# Altium PCB 400921.PcbDoc (part 2 of 3)
Units mm, origin at the board's own origin, x right, y up, seen from the top; angles counter-clockwise.
Board outline 33 x 32.99 mm, 4 copper layers (Top Layer, Mid-Layer 1, Mid-Layer 2, Bottom Layer), stack 0.75 mm thick; 113 components, 68 nets, 329 pads, 369 vias.
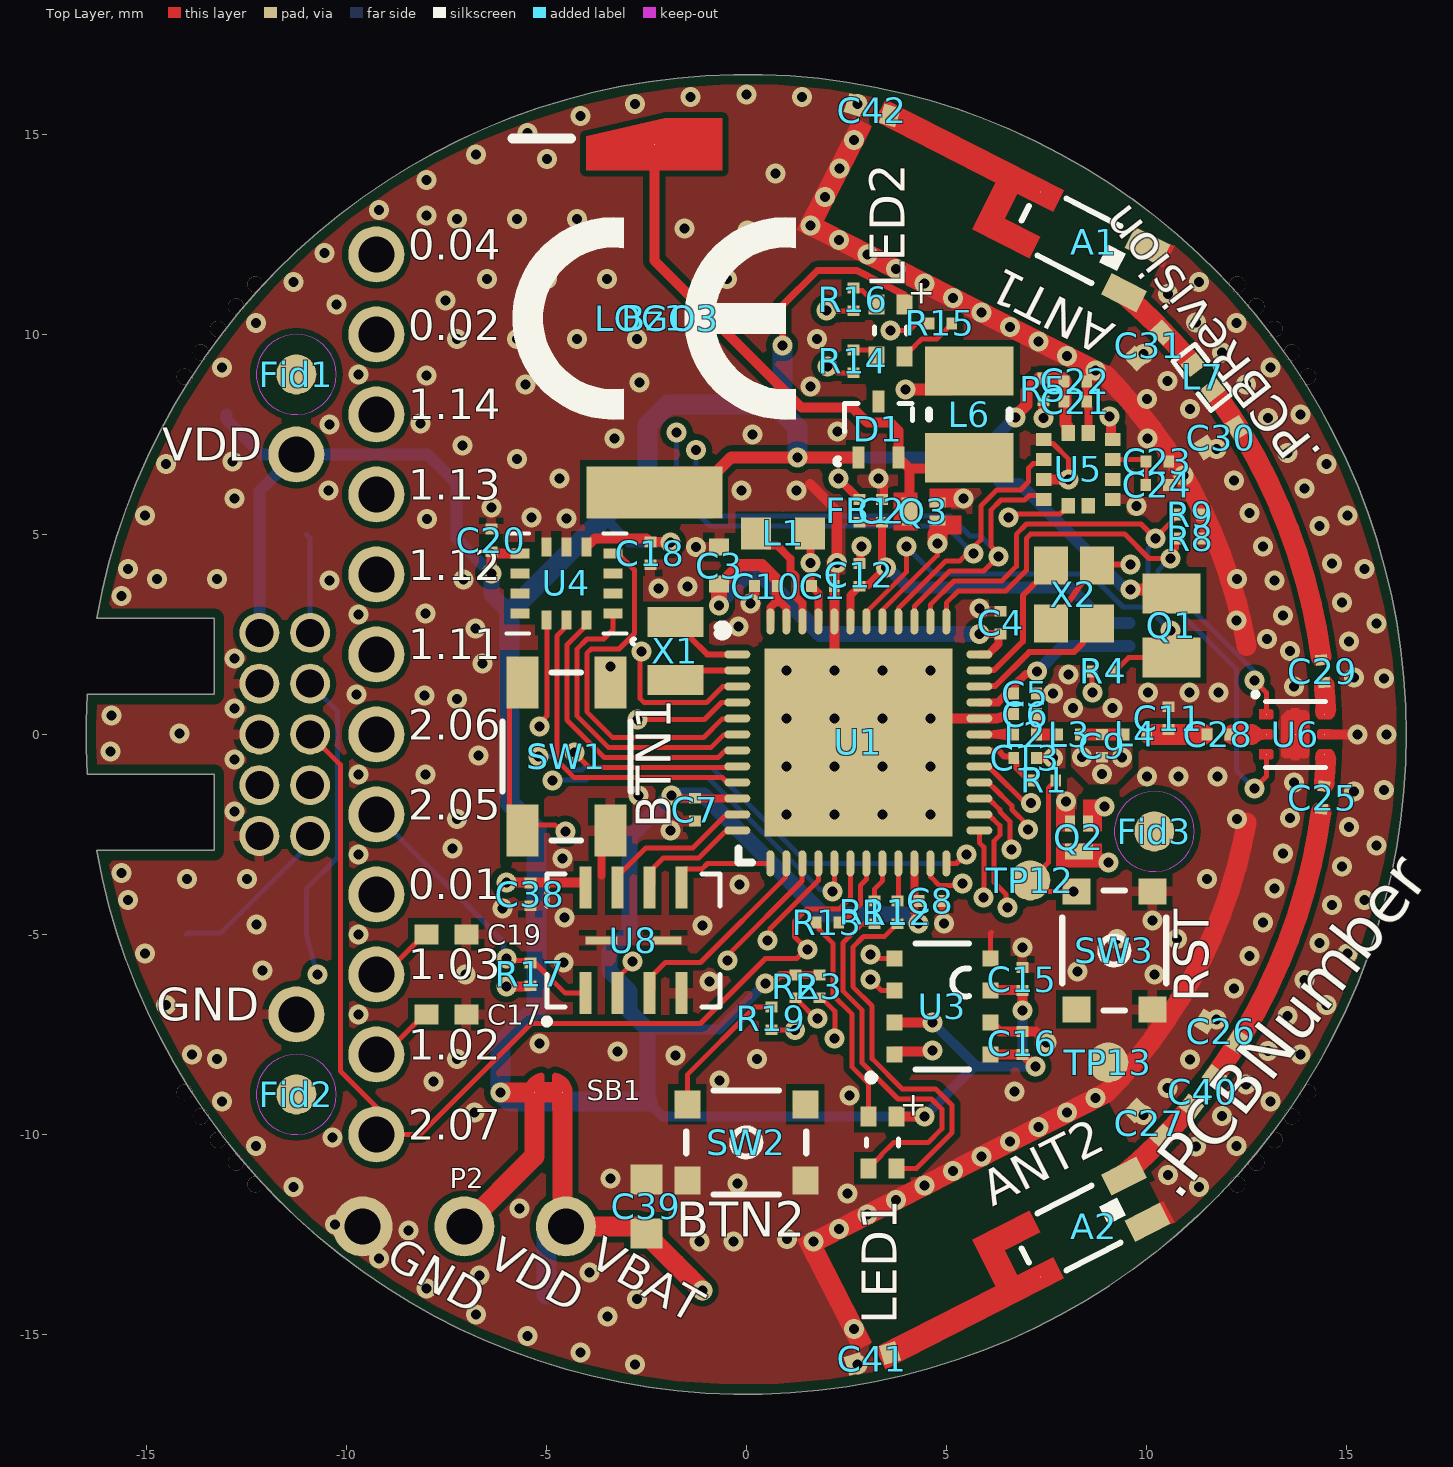
[diagram p0: Top Layer view]

## Part data (continued)
P1: library part "Socket 2x5, 1.27mm, Right Angle, TH", "Socket 2x5, 1.27mm (50mil), Right Angle, TH", Manufacturer=WCON, Manufacturer Part Number=2344-205RS0CUNR3, Part number IPS=N.A., Part number NEMS=100500894, Artikkelnr Noca=N.A., Author=rubr, Component Class=Connectors, Component Status=Active, ComponentLink1Description=Datasheet, ComponentLink1URL=https://www.wcon.com/assets/upload/2023-09-09/C_2344-2XXRXXCUNT1.pdf, ComponentLink2Description="Supplier link", ComponentLink2URL=N.A., Footprint Doc=SOCKET_ANG_2x5_TH-1.27mm, HelpURL=https://www.wcon.com/product/2344-2xxrxxcunx1.html, LatestRevisionDate=2025-01-30, Note="(Replaced 2344-205RS0CUNR1)", Pad Count=10, Part Number="Socket 2x5, 1.27mm, Right Angle, TH", Part number Norautron=N.A., PartId=100500894, Published=2025-01-30, Supplier 1=Milexia, Supplier 2=N.A., Supplier Part Number 1=2344-205RS0CUNR3, Supplier Part Number 2=N.A., System=Connector
P2: library part "Pin List 1x3, N.C.", "Pin List 1x3, 2.54mm (100mil)", Manufacturer=N.A., Part number NEMS=100500305, Artikkelnr Noca=N.A., Assembly="Not mounted", Author=rsk, Component Class=Connectors, Component Status=Active, ComponentLink1Description=Datasheet, ComponentLink1URL=N.A., ComponentLink2Description="Supplier link", ComponentLink2URL=N.A., Footprint Doc=LIST_1x3, HelpURL=N.A., LatestRevisionDate=2017-09-07, Manufacturer Part Number=N.A., Note=N.A., Pad Count=3, Part Number="Pin List 1x3, N.C.", Part number IPS=N.A., Part number Norautron=N.A., PartId=100500305, Published=2017-09-07, Supplier 1=N.A., Supplier 2=N.A., Supplier Part Number 1=N.A., Supplier Part Number 2=N.A., System=Connector
Q1: "Phototransistors 550nm Top View 0805 (2012 Metric)", Manufacturer=Vishay, Part number IPS=N.A., Part number NEMS=101400145, Supplier Part Number 1=751-1056-1-ND, Artikkelnr Noca=N.A., Author=getr, Component Class=Optoelectronics, Component Status=Active, ComponentLink1Description=Datasheet, ComponentLink1URL=https://www.vishay.com/docs/81317/temt6200.pdf, ComponentLink2Description="Supplier link", ComponentLink2URL=https://www.digikey.no/en/products/detail/vishay-semiconductor-opto-division/TEMT6200FX01/1681190?s=N4IgTCBcDaICoFECycBsYAMGBiANDAjAAQgC6AvkA, Footprint Doc=N.A., HelpURL=https://www.vishay.com/en/product/81317/, LatestRevisionDate=2023-11-07, Manufacturer Part Number=TEMT6200FX01, Note=N.A., Pad Count=2, Part Number=TEMT6200FX01, Part number Norautron=N.A., PartId=101400145, Published=2023-11-07, Supplier 1=DigiKey, Supplier 2=N.A., Supplier Part Number 2=N.A.
Q2 Q3: "N-Channel MOSFET, 20V, 1A, 470mOhm, 400mW, -55°C ~ 150°C", Manufacturer="Rohm Semiconductor", Part number IPS=00000009976, Part number NEMS=101300132, Part number Norautron=26320026, Supplier Part Number 1=RV2C010UNT2LCT-ND, Artikkelnr Noca=35010020, Author=rsk, Component Class=Semiconductors, Component Status=Active, ComponentLink1Description=Datasheet, ComponentLink1URL=N.A., ComponentLink2Description="Supplier link", ComponentLink2URL=N.A., Footprint Doc=DFN-3, HelpURL=http://rohmfs.rohm.com/en/products/databook/datasheet/discrete/transistor/mosfet/rv2c010unt2l-e.pdf, LatestRevisionDate=2024-09-18, Manufacturer Part Number=RV2C010UNT2L, Note=N.A., Pad Count=3, Part Number=RV2C010UNT2L, PartId=101300132, Published=2016-08-09, Supplier 1=DigiKey, Supplier 2=Mouser, Supplier Part Number 2=755-RV2C010UNT2L
R1: library part R0201-1k0, "Resistor, ±1%, 0.05W", Manufacturer=N.A., Part number IPS=00000005786, Part number NEMS=100100043, Artikkelnr Noca=N.A., Author=rsk, Component Class=Resistors, Component Status=Active, ComponentLink1Description=Datasheet, ComponentLink1URL=N.A., ComponentLink2Description="Supplier link", ComponentLink2URL=N.A., Footprint Doc=0201, HelpURL=N.A., LatestRevisionDate=2014-11-13, Manufacturer Part Number=N.A., Note="Chip Res 1%", Pad Count=2, Part Number=R0201-1k0, Part number Norautron=N.A., PartId=100100043, Published=2014-11-13, Supplier 1=N.A., Supplier 2=N.A., Supplier Part Number 1=N.A., Supplier Part Number 2=N.A.
R2 R3: library part R0201-10k, "Resistor, ±1%, 0.05W", Manufacturer=N.A., Part number IPS=00000001255, Part number NEMS=100100065, Part number Norautron=26107101, Artikkelnr Noca=N.A., Author=rsk, Component Class=Resistors, Component Status=Active, ComponentLink1Description=Datasheet, ComponentLink1URL=N.A., ComponentLink2Description="Supplier link", ComponentLink2URL=N.A., Footprint Doc=0201, HelpURL=N.A., LatestRevisionDate=2014-11-13, Manufacturer Part Number=N.A., Note="Chip Res 1%", Pad Count=2, Part Number=R0201-10k, PartId=100100065, Published=2014-11-13, Supplier 1=N.A., Supplier 2=N.A., Supplier Part Number 1=N.A., Supplier Part Number 2=N.A.
R4: library part R0201-2k7, "Resistor, ±1%, 0.05W", Manufacturer=N.A., Part number NEMS=100100054, Part number Norautron=26108481, Artikkelnr Noca=N.A., Author=rsk, Component Class=Resistors, Component Status=Active, ComponentLink1Description=Datasheet, ComponentLink1URL=N.A., ComponentLink2Description="Supplier link", ComponentLink2URL=N.A., Footprint Doc=0201, HelpURL=N.A., LatestRevisionDate=2014-11-13, Manufacturer Part Number=N.A., Note="Chip Res 1%", Pad Count=2, Part Number=R0201-2k7, Part number IPS=N.A., PartId=100100054, Published=2014-11-13, Supplier 1=N.A., Supplier 2=N.A., Supplier Part Number 1=N.A., Supplier Part Number 2=N.A.
R5: library part R0201-10R, "Resistor, ±1%, 0.05W", Manufacturer=N.A., Part number NEMS=100100014, Artikkelnr Noca=N.A., Author=rsk, Component Class=Resistors, Component Status=Active, ComponentLink1Description=Datasheet, ComponentLink1URL=N.A., ComponentLink2Description="Supplier link", ComponentLink2URL=N.A., Footprint Doc=0201, HelpURL=N.A., LatestRevisionDate=2014-11-13, Manufacturer Part Number=N.A., Note="Chip Res 1%", Pad Count=2, Part Number=R0201-10R, Part number IPS=N.A., Part number Norautron=N.A., PartId=100100014, Published=2014-11-13, Supplier 1=N.A., Supplier 2=N.A., Supplier Part Number 1=N.A., Supplier Part Number 2=N.A.
R6: library part R0201-4R7, "Resistor, ±1%, 0.05W", Manufacturer=N.A., Part number IPS=00000002486, Part number NEMS=100100010, Artikkelnr Noca=N.A., Author=rsk, Component Class=Resistors, Component Status=Active, ComponentLink1Description=Datasheet, ComponentLink1URL=N.A., ComponentLink2Description="Supplier link", ComponentLink2URL=N.A., Footprint Doc=0201, HelpURL=N.A., LatestRevisionDate=2014-11-13, Manufacturer Part Number=N.A., Note="Chip Res 1%", Pad Count=2, Part Number=R0201-4R7, Part number Norautron=N.A., PartId=100100010, Published=2014-11-13, Supplier 1=N.A., Supplier 2=N.A., Supplier Part Number 1=N.A., Supplier Part Number 2=N.A.
R8 R9: library part R0201-1M0, "Resistor, ±1%, 0.05W", Manufacturer=N.A., Part number IPS=00000001418, Part number NEMS=100100093, Part number Norautron=26107108, Artikkelnr Noca=N.A., Author=rsk, Component Class=Resistors, Component Status=Active, ComponentLink1Description=Datasheet, ComponentLink1URL=N.A., ComponentLink2Description="Supplier link", ComponentLink2URL=N.A., Footprint Doc=0201, HelpURL=N.A., LatestRevisionDate=2014-11-13, Manufacturer Part Number=N.A., Note="Chip Res 1%", Pad Count=2, Part Number=R0201-1M0, PartId=100100093, Published=2014-11-13, Supplier 1=N.A., Supplier 2=N.A., Supplier Part Number 1=N.A., Supplier Part Number 2=N.A.
R11 R14: library part R0201-390, "Resistor, ±1%, 0.05W", Manufacturer=N.A., Part number IPS=00000001258, Part number NEMS=100100035, Part number Norautron=26470031, Artikkelnr Noca=N.A., Author=rsk, Component Class=Resistors, Component Status=Active, ComponentLink1Description=Datasheet, ComponentLink1URL=N.A., ComponentLink2Description="Supplier link", ComponentLink2URL=N.A., Footprint Doc=0201, HelpURL=N.A., LatestRevisionDate=2014-11-13, Manufacturer Part Number=N.A., Note="Chip Res 1%", Pad Count=2, Part Number=R0201-390, PartId=100100035, Published=2014-11-13, Supplier 1=N.A., Supplier 2=N.A., Supplier Part Number 1=N.A., Supplier Part Number 2=N.A.
R12 R15: library part R0201-2k2, "Resistor, ±1%, 0.05W", Manufacturer=N.A., Part number IPS=00000001257, Part number NEMS=100100052, Part number Norautron=26470030, Artikkelnr Noca=N.A., Author=rsk, Component Class=Resistors, Component Status=Active, ComponentLink1Description=Datasheet, ComponentLink1URL=N.A., ComponentLink2Description="Supplier link", ComponentLink2URL=N.A., Footprint Doc=0201, HelpURL=N.A., LatestRevisionDate=2014-11-13, Manufacturer Part Number=N.A., Note="Chip Res 1%", Pad Count=2, Part Number=R0201-2k2, PartId=100100052, Published=2014-11-13, Supplier 1=N.A., Supplier 2=N.A., Supplier Part Number 1=N.A., Supplier Part Number 2=N.A.
R13 R16: library part R0201-1k2, "Resistor, ±1%, 0.05W", Manufacturer=N.A., Part number IPS=00000001256, Part number NEMS=100100045, Part number Norautron=26107084, Artikkelnr Noca=N.A., Author=rsk, Component Class=Resistors, Component Status=Active, ComponentLink1Description=Datasheet, ComponentLink1URL=N.A., ComponentLink2Description="Supplier link", ComponentLink2URL=N.A., Footprint Doc=0201, HelpURL=N.A., LatestRevisionDate=2014-11-13, Manufacturer Part Number=N.A., Note="Chip Res 1%", Pad Count=2, Part Number=R0201-1k2, PartId=100100045, Published=2014-11-13, Supplier 1=N.A., Supplier 2=N.A., Supplier Part Number 1=N.A., Supplier Part Number 2=N.A.
R17: library part R0201-100k, "Resistor, ±1%, 0.05W", Manufacturer=N.A., Part number IPS=00000001419, Part number NEMS=100100080, Part number Norautron=26108487, Artikkelnr Noca=N.A., Author=rsk, Component Class=Resistors, Component Status=Active, ComponentLink1Description=Datasheet, ComponentLink1URL=N.A., ComponentLink2Description="Supplier link", ComponentLink2URL=N.A., Footprint Doc=0201, HelpURL=N.A., LatestRevisionDate=2014-11-13, Manufacturer Part Number=N.A., Note="Chip Res 1%", Pad Count=2, Part Number=R0201-100k, PartId=100100080, Published=2014-11-13, Supplier 1=N.A., Supplier 2=N.A., Supplier Part Number 1=N.A., Supplier Part Number 2=N.A.
R19: library part R0201-0R, "Resistor, ±5%, 0.05W", Manufacturer=N.A., Part number IPS=00000003245, Part number NEMS=100100001, Artikkelnr Noca=N.A., Author=rsk, Component Class=Resistors, Component Status=Active, ComponentLink1Description=Datasheet, ComponentLink1URL=N.A., ComponentLink2Description="Supplier link", ComponentLink2URL=N.A., Footprint Doc=0201, HelpURL=N.A., LatestRevisionDate=2017-11-09, Manufacturer Part Number=N.A., Note="Chip Res 5%", Pad Count=2, Part Number=R0201-0R, Part number Norautron=N.A., PartId=100100001, Published=2014-11-13, Supplier 1=N.A., Supplier 2=N.A., Supplier Part Number 1=N.A., Supplier Part Number 2=N.A.
SB1: library part "Solderbridge Shorted Power", "Shorted Solderbridge Power", Manufacturer=N.A., Part number NEMS=100500460, Artikkelnr Noca=N.A., Author=rsk, Component Class=Connectors, Component Status=Active, ComponentLink1Description=Datasheet, ComponentLink1URL=N.A., ComponentLink2Description="Supplier link", ComponentLink2URL=N.A., Footprint Doc=Solderbridge_Shorted_Power, HelpURL=N.A., LatestRevisionDate=2012-08-07, Manufacturer Part Number=N.A., Note=N.A., Pad Count=2, Part Number="Solderbridge Shorted Power", Part number IPS=N.A., Part number Norautron=N.A., PartId=100500460, Published=2012-08-07, Supplier 1=N.A., Supplier 2=N.A., Supplier Part Number 1=N.A., Supplier Part Number 2=N.A., System=Connector
SW1: library part L-KLS7-TS3402-2.5-250-B-T, "Tactile Switch, SPNO, SMD, 260gf, 4.2x3.3x2.5mm", Manufacturer="KLS Electronic", Part number IPS=N.A., Part number NEMS=101500152, Artikkelnr Noca=N.A., Author=rubr, Component Class=Switches, Component Status=Active, ComponentLink1Description=Datasheet, ComponentLink1URL=https://img.klsele.com/admin/product_upload/20220406093556L-KLS7-TS3402.pdf, ComponentLink2Description="Supplier link", ComponentLink2URL=N.A., Footprint Doc=KLS-TS3402, HelpURL=https://www.klsele.com/products/Switches/Tactile-switches/4201.html, LatestRevisionDate=2026-02-09, Manufacturer Part Number=L-KLS7-TS3402-2.5-250-B-T, Note=N.A., Pad Count=4, Part Number=L-KLS7-TS3402-2.5-250-B-T, Part number Norautron=N.A., PartId=101500152, Published=2025-01-23, Supplier 1=Milexia, Supplier 2=N.A., Supplier Part Number 1=L-KLS7-TS3402-2.5-250-B-T, Supplier Part Number 2=N.A.
SW2 SW3: library part "KMT021 NGJ LHS", "Nano-Miniature Top Actuated Tact Switch with extended life 3.0x2.6mm", Manufacturer=C&K, Part number IPS=00000005416, Part number NEMS=101500039, Part number Norautron=N.A., Supplier Part Number 1=CKN10289CT-ND, Artikkelnr Noca=N.A., Author=rsk, Component Class=Switches, Component Status=Active, ComponentLink1Description=Datasheet, ComponentLink1URL=N.A., ComponentLink2Description="Supplier link", ComponentLink2URL=N.A., Footprint Doc=SW_TACTILE_2.6x3.0MM_4-LEAD, HelpURL=http://media.digikey.com/pdf/Data%20Sheets/C&K/KMT_0xx_NGJ_LHS_Drawing.pdf, LatestRevisionDate=2013-08-12, Manufacturer Part Number="KMT021 NGJ LHS", Note=N.A., Pad Count=4, Part Number="KMT021 NGJ LHS", PartId=101500039, Published=2013-08-12, Supplier 1=DigiKey, Supplier 2=Farnell, Supplier Part Number 2=190-8260
TP1 TP2 TP3 TP4 TP5 TP6 TP7: library part TP_SMD_Ø1.5MM, "1.5mm circular SMD testpad", Manufacturer="Nordic Semiconductor", Manufacturer Part Number=N.A., Part number NEMS=100500477, Artikkelnr Noca=N.A., Author=rsk, Component Class=Connectors, Component Status=Active, ComponentLink1Description=Datasheet, ComponentLink1URL=N.A., ComponentLink2Description="Supplier link", ComponentLink2URL=N.A., Footprint Doc=TP_SMD_Ø1.5mm, HelpURL=N.A., LatestRevisionDate=2021-03-05, Note=N.A., Pad Count=1, Part Number=TP_SMD_Ø1.5MM, Part number IPS=N.A., Part number Norautron=N.A., PartId=100500477, Published=2016-06-02, Supplier 1=N.A., Supplier 2=N.A., Supplier Part Number 1=N.A., Supplier Part Number 2=N.A.
TP12 TP13: library part TP_SMD_Ø1.0MM, "1.0mm circular SMD testpad", Manufacturer="Nordic Semiconductor", Manufacturer Part Number=N.A., Part number NEMS=100500475, Artikkelnr Noca=N.A., Author=rsk, Component Class=Connectors, Component Status=Active, ComponentLink1Description=Datasheet, ComponentLink1URL=N.A., ComponentLink2Description="Supplier link", ComponentLink2URL=N.A., Footprint Doc=TP_SMD_Ø1.0mm, HelpURL=N.A., LatestRevisionDate=2021-03-05, Note=N.A., Pad Count=1, Part Number=TP_SMD_Ø1.0MM, Part number IPS=N.A., Part number Norautron=N.A., PartId=100500475, Published=2013-06-11, Supplier 1=N.A., Supplier 2=N.A., Supplier Part Number 1=N.A., Supplier Part Number 2=N.A.
U1: "Multi-protocol Bluetooth Low Energy, IEEE 802.15.4 and 2.4GHz proprietary Wireless MCU", Manufacturer="Nordic Semiconductor", Part number IPS=N.A., Part number NEMS=102000382, Artikkelnr Noca=N.A., Author=stl1, Component Class=Nordic_Devices, Component Status=Active, ComponentLink1Description=Datasheet, ComponentLink1URL=N.A., ComponentLink2Description="Supplier link", ComponentLink2URL=N.A., Footprint Doc=QFN-48, HelpURL=N.A., LatestRevisionDate=2025-01-30, Manufacturer Part Number=nRF54L15-QFAA-C00, Note=N.A., Pad Count=49, Part Number=nRF54L15-QFAA-C00, Part number Norautron=N.A., PartId=102000382, Published=2025-01-30, Supplier 1="Nordic Semiconductor", Supplier 2=N.A., Supplier Part Number 1=nRF54L15-QFAA-C00, Supplier Part Number 2=N.A.
U3: "Low power gas, pressure, temperature & humidity sensor", Manufacturer=Bosch, Part number IPS=N.A., Part number NEMS=101900619, Supplier Part Number 1=828-BME688TR-ND, Artikkelnr Noca=N.A., Author=rsk, Component Class=Misc_ICs, Component Status=Active, ComponentLink1Description=Datasheet, ComponentLink1URL=https://www.bosch-sensortec.com/media/boschsensortec/downloads/datasheets/bst-bme688-ds000.pdf, ComponentLink2Description="Supplier link", Footprint Doc=LGA-8, HelpURL=https://www.bosch-sensortec.com/products/environmental-sensors/gas-sensors/bme688/, LatestRevisionDate=2024-10-03, Manufacturer Part Number=BME688, Note=N.A., Pad Count=8, Part Number=BME688, Part number Norautron=N.A., PartId=101900619, Published=2020-07-07, Supplier 1=DigiKey, Supplier 2=N.A., Supplier Part Number 2=N.A.
U4: "6-axis, smart, low-power, inertial measurement unit", Manufacturer=Bosch, Part number IPS=N.A., Part number NEMS=101900620, Supplier Part Number 1=828-1091-1-ND, Artikkelnr Noca=N.A., Author=rsk, Component Class=Misc_ICs, Component Status=Active, ComponentLink1Description=Datasheet, ComponentLink1URL=https://www.bosch-sensortec.com/media/boschsensortec/downloads/datasheets/bst-bmi270-ds000.pdf, ComponentLink2Description="Supplier link", ComponentLink2URL=https://www.bosch-sensortec.com/products/motion-sensors/imus/bmi270.html, Footprint Doc=LGA-14, HelpURL=https://www.bosch-sensortec.com/media/boschsensortec/downloads/datasheets/bst-bmi270-ds000.pdf, LatestRevisionDate=2021-08-03, Manufacturer Part Number=BMI270, Note=N.A., Pad Count=14, Part Number=BMI270, Part number Norautron=N.A., PartId=101900620, Published=2020-07-07, Supplier 1=DigiKey, Supplier 2=Mouser, Supplier Part Number 2=262-BMI270
U5: library part ADXL367BCCZ, "Micropower, 3-Axis, ±2 g/±4 g/±8 g Digital Output MEMS Accelerometer", Manufacturer="Analog Devices", Part number IPS=N.A., Part number NEMS=101900775, Supplier Part Number 1=505-ADXL367BCCZ-RL7CT-ND, Artikkelnr Noca=N.A., Author=rubr, Component Class=Misc_ICs, Component Status=Active, ComponentLink1Description=Datasheet, ComponentLink1URL=http://www.analog.com/media/en/technical-documentation/data-sheets/ADXL367.pdf, ComponentLink2Description="Supplier link", ComponentLink2URL=https://www.digikey.com/en/products/detail/analog-devices-inc/ADXL367BCCZ-RL7/16360579, Footprint Doc=LGA-12, HelpURL=http://www.analog.com/en/products/ADXL367.html, LatestRevisionDate=2023-04-03, Manufacturer Part Number=ADXL367BCCZ, Note=N.A., Pad Count=12, Part Number=ADXL367BCCZ, Part number Norautron=N.A., PartId=101900775, Published=2023-04-03, Supplier 1=DigiKey, Supplier 2=Mouser, Supplier Part Number 2=584-ADXL367BCCZ-RL7
U6: "50 MHz-6.0 GHz GaAs SPDT Switch", Manufacturer=Skyworks, Part number IPS=N.A., Part number NEMS=101900872, Supplier Part Number 1=863-1335-1-ND, Artikkelnr Noca=N.A., Author=rubr, Component Class=Misc_ICs, Component Status=Active, ComponentLink1Description=Datasheet, ComponentLink1URL=https://www.skyworksinc.com/-/media/E9327268CB16479EBC64472424698E70.pdf, ComponentLink2Description="Supplier link", ComponentLink2URL=https://www.digikey.com/en/products/detail/skyworks-solutions-inc/SKY13348-374LF/2658308, Footprint Doc=XFDFN-6, HelpURL=https://www.skyworksinc.com/Products/Switches/SKY13348-374LF, LatestRevisionDate=2025-04-09, Manufacturer Part Number=SKY13348-374LF, Note=N.A., Pad Count=6, Part Number=SKY13348-374LF, Part number Norautron=N.A., PartId=101900872, Published=2025-04-09, Supplier 1=DigiKey, Supplier 2=N.A., Supplier Part Number 2=N.A.
U8: library part MX25R6435FZBIH3, "Ultra low power, 64M-bit, serial multi I/O flash memory", Manufacturer=Macronix, Part number IPS=N.A., Part number NEMS=101900860, Supplier Part Number 1=1092-MX25R6435FZBIH3CT-ND, Artikkelnr Noca=N.A., Author=rubr, Component Class=Misc_ICs, Component Status=Active, ComponentLink1Description=Datasheet, ComponentLink1URL=https://www.macronix.com/Lists/Datasheet/Attachments/8868/MX25R6435F,%20Wide%20Range,%2064Mb,%20v1.6.pdf, ComponentLink2Description="Supplier link", ComponentLink2URL=https://www.digikey.com/en/products/detail/macronix/MX25R6435FZBIH3/21700503, Footprint Doc=USON-8, HelpURL=https://www.macronix.com/en-us/products/NOR-Flash/Serial-NOR-Flash/Pages/spec.aspx?p=MX25R6435F&m=Serial%20NOR%20Flash&n=PM2138&epn=MX25R6435FZBIH3, LatestRevisionDate=2025-02-11, Manufacturer Part Number=MX25R6435FZBIH3, Note=N.A., Pad Count=8, Part Number=MX25R6435FZBIH3, Part number Norautron=N.A., PartId=101900860, Published=2025-02-11, Supplier 1=DigiKey, Supplier 2=N.A., Supplier Part Number 2=N.A.
X1: library part XTAL_SMD2012_32.768kHz_9pF_TXC, "XTAL SMD 2012, 32.768kHz, 9pF, ±20ppm", Manufacturer="TXC Corporation", Manufacturer Part Number=9HT11-32.768KDZC-T, Part number IPS=N.A., Part number NEMS=101600107, Supplier Part Number 1=887-1426-2-ND, Artikkelnr Noca=N.A., Author=eisk, Component Class=Oscillators, Component Status=Active, ComponentLink1Description=Datasheet, ComponentLink1URL=http://www.txccrystal.com/images/pdf/9ht11.pdf, ComponentLink2Description="Supplier link", ComponentLink2URL=https://www.digikey.com/en/products/detail/9HT11-32.768KDZC-T/887-1426-1-ND/2403277, Footprint Doc=XTAL_2012, HelpURL=http://www.txccrystal.com/images/pdf/9ht11.pdf, LatestRevisionDate=2023-03-14, Note="XTAL SMD 32.768kHz", Pad Count=2, Part Number=XTAL_SMD2012_32.768kHz_9pF_TXC, Part number Norautron=N.A., PartId=101600107, Published=2014-03-28, Supplier 1=DigiKey, Supplier 2=Mouser, Supplier Part Number 2=717-9HT11-32.7KDZC-T
X2: library part XTAL_SMD2016_32MHz_8pF_Kyocera, "XTAL SMD 2016, 32MHz, Cl=8pF, Tot: ±40ppm", Manufacturer=Kyocera, Manufacturer Part Number=CX2016DB32000D0WZRC1, Part number IPS=00000007827, Part number NEMS=101600039, Part number Norautron=26511136, Supplier Part Number 1=1253-1586-1-ND, Artikkelnr Noca=22010022, Author=rsk, Component Class=Oscillators, Component Status=Active, ComponentLink1Description=Datasheet, ComponentLink1URL=N.A., ComponentLink2Description="Supplier link", ComponentLink2URL=N.A., Footprint Doc=XTAL_2016, HelpURL=http://media.digikey.com/pdf/Data%20Sheets/AVX%20PDFs/CX2016DB32000D0WZRC1_Spec.pdf, LatestRevisionDate=2016-06-02, Note="XTAL SMD 32.000MHz", Pad Count=4, Part Number=XTAL_SMD2016_32MHz_8pF_Kyocera, PartId=101600039, Published=2015-10-15, Supplier 1=DigiKey, Supplier 2=N.A., Supplier Part Number 2=N.A.

## Free pads (board coordinates)
  round 0.4 hole 0.4 unplated: 0(-14.042,-8.946) 0(-14.042,8.946) 0(-13.639,-9.55) 0(-13.639,9.55) 0(-13.209,-10.136) 0(-13.209,10.136) 0(-12.755,-10.702) 0(-12.755,10.702) 0(-12.276,-11.249) 0(-12.276,11.249) 0(12.276,-11.249) 0(12.276,11.249) 0(12.755,-10.702) 0(12.755,10.702) 0(13.209,-10.136) 0(13.209,10.136) 0(13.639,-9.55) 0(13.639,9.55) 0(14.042,-8.946) 0(14.042,8.946)

## Via types
v1: diameter 0.5, hole 0.25, Top Layer to Bottom Layer, tented both sides, 369 vias

## Nets (pads, with @x,y where several pads share a name; then routed paths per layer and width w, separated by ;. In a path a pad name is that pad's centre, name@x,y a point inside that pad or via, vN(x,y) a via of type N, cw(c..) or ccw(c..) an arc to the next point about the centre after c; other vN are vias at no path point)
ANT1: C29.1 C30.2 L7.1 | length 7.1
  Top Layer w0.517: L7.1@11.729,8.525 cw(c0,0) C29.1@14.364,1.985
ANT2: C25.1 C26.2 C40.1 | length 7.1
  Top Layer w0.517: C40.1@11.729,-8.525 ccw(c0,0) C25.1@14.364,-1.985
DCC: L1.1 U1.46 | length 2.8
  Top Layer w0.2: L1.1@0.248,5.028 0.248,5.003 0.523,4.728 0.766,4.728 1.101,4.393 1.101,4.088 1.228,3.961 1.228,3.456 1.4,3.284 U1.46@1.4,2.825
DECA: C2.2 C12.2 FB1.2 FB2.2 R6.2 U1.43 | length 10.2
  Top Layer w0.2: U1.43@2.6,2.825 2.6,3.474 C12.2@2.828,3.702 2.863,3.737 3.05,3.737 v1@3.488,4.175 ; FB1.2@2.828,5.302 C2.2@3.388,5.302 3.388,4.349 3.488,4.249 v1(3.488,4.168)
  Bottom Layer w0.3: v1(3.488,4.168) 3.542,4.168 4.036,3.675 8.085,3.675 FB2.2@8.975,2.785 R6.2@9.575,2.785
DECD: C1.2 FB1.1 L1.2 U1.45 | length 5.4
  Top Layer w0.2: L1.2@1.609,5.068 v1(1.609,4.292) 1.609,3.73 C1.2@1.63,3.709 1.63,3.694 1.665,3.659 1.68,3.659 1.8,3.539 1.8,3.05 U1.45@1.8,2.825 ; v1(2.3,6.4) 2.778,5.922 2.778,5.907 2.813,5.872 FB1.1@2.828,5.872
  Mid-Layer 2 w0.2: v1(1.609,4.292) 1.609,5.584 v1@2.3,6.275
DECRF: C5.2 FB2.1 R6.1 U1.33 | length 4.5
  Top Layer w0.2: U1.33@5.825,0.8 6.288,0.8 6.457,0.969 6.648,0.969 6.683,1.004 C5.2@6.683,1.019 ; C5.2@6.683,1.015 6.718,1.05 6.718,1.245 6.989,1.516 7.215,1.516 v1(7.273,1.574)
  Bottom Layer w0.3: v1(7.273,1.574) 7.914,2.215 R6.1@9.575,2.215